# Altium PCB Karta_TETRA.PCBDOC (part 6 of 8)
Units mm, origin at the board's own origin, x right, y up, seen from the top; angles counter-clockwise.
Board outline 70 x 83.2 mm, 6 copper layers (TopLayer, Layer 1, Layer 2, Layer 3, Layer 4, Bottom Layer), stack 0.914 mm thick; 344 components, 222 nets, 1133 pads, 615 vias.
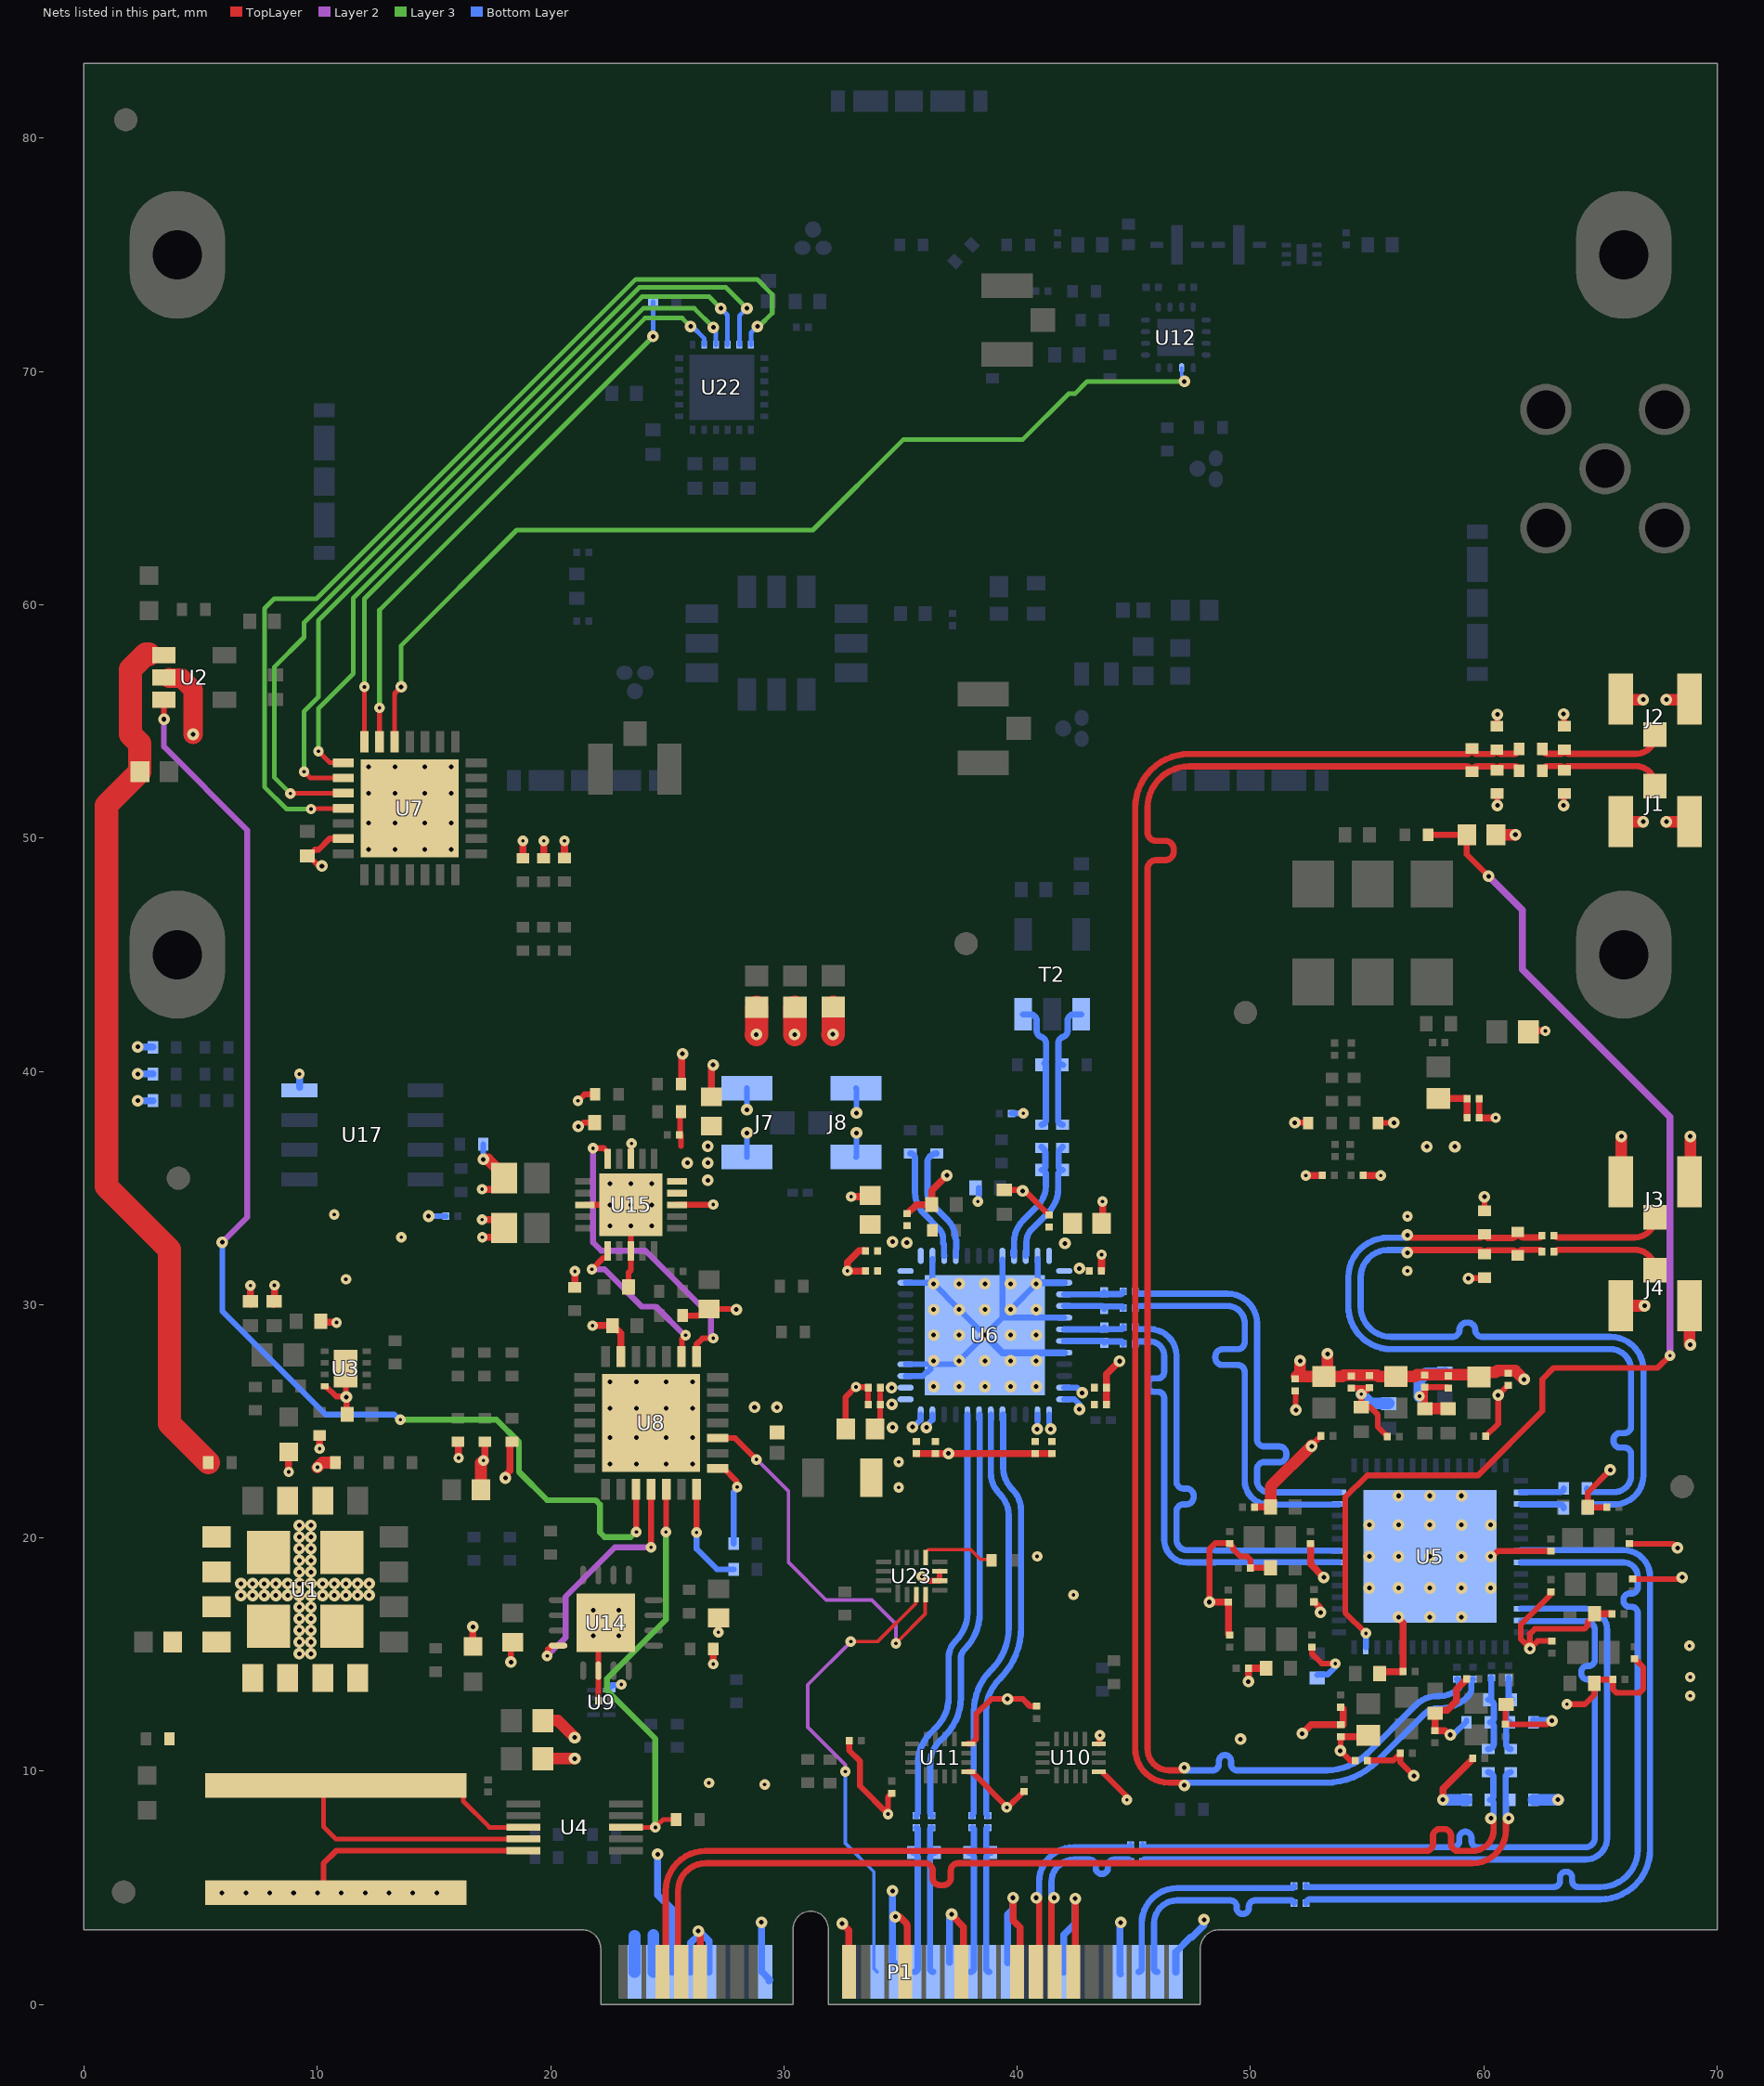
[diagram p7: the nets of this part, all layers, seen from the top]

## Via types
v1: diameter 0.5, hole 0.2, TopLayer to Bottom Layer, tented both sides, 402 vias
v2: diameter 0.45, hole 0.15, TopLayer to Bottom Layer, tented both sides, 189 vias
v3: diameter 0.45, hole 0.15, TopLayer to Bottom Layer, 23 vias
v4: diameter 0.5, hole 0.2, TopLayer to Bottom Layer, 1 vias

## Nets (pads, with @x,y where several pads share a name; then routed paths per layer and width w, separated by ;. In a path a pad name is that pad's centre, name@x,y a point inside that pad or via, vN(x,y) a via of type N, cw(c..) or ccw(c..) an arc to the next point about the centre after c; other vN are vias at no path point) (continued)
12V: C1.2 C3.2 R3.2 R106.2 R121.2 U1.1 U1.2 U1.3 U1.4 U2.1 U4.8 U4.9 | length 57.4
  TopLayer w0.2: U4.9@18.827,7.094 10.793,7.094 10.267,7.62 10.267,8.965 10.692,9.39 R106.2@10.789,9.39 15.837,9.39 16.262,8.965 16.262,8.714 17.382,7.594 U4.8@18.827,7.594
  TopLayer w1: 2.789,57.881 2.65,57.881 1.999,57.23 1.999,54.446 2.389,54.056 2.389,52.832 0.965,51.408 0.965,35.06 3.661,32.364 3.661,24.897 R3.2@5.328,23.229
2122_0VDD: C88.2 C89.2 C90.2 C179.2 FB7.2 U6.25 U6.26 U6.35 U6.36 | length 2.7
  Bottom Layer w0.25: v1(35.509,24.753) 35.553,24.753 35.867,25.067 U6.36@35.867,25.292 ; v1(36.109,24.732) 36.157,24.78 36.157,24.857 36.367,25.067 U6.35@36.367,25.292 ; v1(40.855,24.668) 40.867,24.681 U6.26@40.867,25.292 ; U6.25@41.367,25.292 41.367,24.799 41.431,24.736 v1(41.431,24.668)
  other v3: 34.924,22.166 34.924,23.254
2122_VCC: C76.2 C77.2 C78.2 C79.2 C80.2 C81.2 C82.2 C83.2 C84.2 C85.2 C86.2 C87.2 FB6.2 R96.1 U6.1 U6.12 U6.13 U6.23 U6.24 U6.37 U6.38 U6.48 | length 3.7
  TopLayer w0.25: C86.2@33.899,24.663 34.129,24.894 C81.2@34.129,25.723 C83.2@34.129,26.442
  Bottom Layer w0.25: U6.24@42.017,25.942 42.452,25.942 42.669,25.725 v1(42.669,25.516) ; U6.23@42.017,26.442 42.561,26.442 v1(42.786,26.218)
  other v1: 34.658,24.731 28.744,25.603 29.701,25.602 34.631,25.734 34.615,26.438 42.669,31.552 42.044,32.622 35.27,32.652 34.661,32.692
4610_FINE_3V3: C93.2 C94.2 C97.2 C98.2 C101.2 C102.2 C105.2 C106.2 C109.2 C110.2 C129.2 C130.2 FB8.1 FB9.1 FB10.1 FB11.1 FB12.1 R100.2 R104.2 R105.2 U15.14 U15.15 | length 20.8
  TopLayer w0.25: v2(21.173,38.736) 21.455,39.018 R104.2@21.96,39.018 ; C130.2@25.55,37.314 25.55,38.23 R100.2@25.588,38.268 ; 25.588,36.813 C130.2@25.588,37.279 ; C98.2@53.873,11.481 53.859,11.468 53.859,10.894 v1(53.846,10.881) 54.266,10.461 C97.2@54.495,10.461
  TopLayer w0.3: R105.2@21.034,30.741 21.039,30.747 21.039,31.425 v2(21.045,31.431) ; C105.2@51.923,26.821 53.052,26.821 FB11.1@53.151,26.919 ; C98.2@53.978,11.474 54.979,11.474 FB9.1@55.049,11.544 ; FB12.1@58.054,38.836 C110.2@59.278,38.836 C109.2@59.278,38.01 ; C94.2@58.474,26.949 C94.2@58.484,26.949 ; FB8.1@59.779,26.906 FB8.1@59.788,26.898
  TopLayer w0.5: C105.2@51.969,26.919 FB11.1@53.151,26.919 ; C105.2@51.978,26.923 52.126,27.072 v1(52.126,27.592) ; v1(53.298,27.889) 53.298,27.066 FB11.1@53.151,26.919 ; FB8.1@59.779,26.906 59.678,27.007 57.145,27.007 57.052,26.913 FB10.1@56.234,26.913 56.228,26.919 55.484,26.919 55.417,26.986 53.998,26.986 53.93,26.919 FB11.1@53.151,26.919 ; FB8.1@59.788,26.898 59.988,27.098 60.501,27.098 60.576,27.173 61.349,27.173 v1(61.73,26.792)
  other v1: 26.741,35.328 25.86,36.08 26.741,36.08 26.741,36.788 57.558,36.77 58.758,36.77
04610_Stat0: R9.2 U23.9 | length 3.3
  TopLayer w0.15: U23.9@36.077,19.164 36.077,19.389 36.187,19.5 38.006,19.5 38.429,19.076 38.82,19.076 cw(c38.82,18.962) R9.2@38.901,19.043
04610_Stat0_3V3: U8.24 U23.4 | length 16.2
  TopLayer w0.15: v2(34.799,15.476) 36.06,16.737 36.06,17.548 U23.4@36.077,17.564
  TopLayer w0.25: U8.24@27.16,24.279 27.91,24.279 v2(28.827,23.363)
  Layer 2 w0.15: v2(28.827,23.363) 30.2,21.99 30.2,18.946 31.81,17.336 33.766,17.336 34.799,16.303 v2(34.799,15.476)
+12: P1.2 P1.4 R106.1 U4.10 | length 13.5
  TopLayer w0.25: R106.1@10.789,4.79 10.692,4.79 10.267,5.215 10.267,6.053 10.808,6.594 U4.10@18.827,6.594
  Bottom Layer w0.5: P1.2@23.6,1.4 23.6,2.952 ; P1.4@24.4,1.4 24.4,2.99
  other v1: 5.921,4.776 6.942,4.776 7.964,4.776 8.986,4.776 10.008,4.776 11.029,4.776 12.051,4.776 13.073,4.776 14.095,4.776 15.117,4.776
Ain_2122_A_N: R5.1 U6.4 | length 5
  Bottom Layer w0.268: R5.1@36.547,36.478 ccw(c36.547,36.081) 36.151,36.081 36.151,34.802 ccw(c36.891,34.802) 36.367,34.278 37.034,33.612 cw(c36.278,32.857) 37.347,32.857 37.347,32.854 cw(c37.251,32.758) 37.386,32.758 37.386,32.377 ccw(c37.41,32.353) 37.376,32.353 37.376,32.101 U6.4@37.367,32.092
AIn_2122_A_P: R1.1 U6.3 | length 4.9
  Bottom Layer w0.268: R1.1@35.417,36.478 cw(c35.417,36.272) 35.623,36.272 35.623,34.8 ccw(c36.887,34.8) 35.993,33.906 36.658,33.241 cw(c36.271,32.854) 36.819,32.854 36.819,32.663 ccw(c36.886,32.663) 36.838,32.615 cw(c36.791,32.567) 36.858,32.567 36.858,32.101 U6.3@36.867,32.092
AIn_2122_B_N: R53.1 R56.2 U6.9 | length 5.4
  Bottom Layer w0.268: U6.9@39.867,32.092 39.839,32.12 39.839,32.291 cw(c39.887,32.291) 39.853,32.325 ccw(c39.819,32.359) 39.867,32.359 39.867,32.682 cw(c41.182,32.682) 40.252,33.612 40.875,34.235 ccw(c40.011,35.099) 41.233,35.099 41.233,35.585 ccw(c41.047,35.585) 41.047,35.771 ccw(c41.047,35.937) 41.213,35.937 41.213,36.507 ccw(c40.988,36.507) R56.2@41.147,36.666 ; R56.2@41.047,36.766 R56.2@41.147,36.666
AIn_2122_B_P: R51.2 R53.2 U6.10 | length 5.4
  Bottom Layer w0.268: U6.10@40.367,32.092 40.395,32.12 40.395,32.678 cw(c41.191,32.678) 40.628,33.241 41.326,33.939 ccw(c40.275,34.989) 41.761,34.989 41.761,35.585 cw(c41.947,35.585) 41.947,35.771 cw(c41.947,35.947) 41.771,35.947 41.771,36.403 ccw(c41.747,36.427) 41.781,36.427 41.781,36.507 cw(c42.007,36.507) 41.847,36.666 R51.2@41.947,36.766
AIn_2122B_N: R55.1 R56.1 T2.1 | length 5.6
  Bottom Layer w0.268: T2.1@40.248,42.443 40.566,42.443 cw(c40.566,42.175) 40.834,42.175 40.834,41.743 ccw(c41.118,41.743) 41.041,41.47 cw(c40.966,41.212) 41.234,41.212 41.234,40.504 cw(c41.006,40.504) 41.166,40.341 41.233,40.341 41.233,37.902 cw(c41.047,37.902) R56.1@41.047,37.716
AIn_2122B_P: R51.1 R52.2 T2.3 | length 5.7
  Bottom Layer w0.268: R52.2@41.761,40.341 41.761,37.902 ccw(c41.947,37.902) R51.1@41.947,37.716 ; R52.2@41.98,40.275 cw(c41.98,40.492) 41.762,40.492 41.762,41.212 cw(c42.03,41.212) 41.957,41.47 ccw(c41.878,41.743) 42.162,41.743 42.162,42.175 cw(c42.43,42.175) 42.43,42.443 T2.3@42.748,42.443
Alert_curr_vol_meas: R107.1 U4.3 U8.19 | length 18.7
  TopLayer w0.2: U4.3@23.227,7.594 v2(24.491,7.594) 24.824,7.928 R107.1@25.383,7.928
  TopLayer w0.25: v2(24.945,20.249) 24.953,20.257 24.953,22.072 U8.19@24.96,22.079
  Layer 3 w0.25: v2(24.491,7.594) 24.491,11.392 22.419,13.464 22.419,13.969 24.945,16.495 v2(24.945,20.249)
ATT_TETRA_V1: R83.2 U7.27 | length 23.7
  TopLayer w0.2: U7.27@12.667,54.127 v2(12.667,55.583)
  Layer 3 w0.2: v2(12.667,55.583) 12.667,59.774 v1(24.393,71.5)
  Bottom Layer w0.2: v1(24.393,71.5) R83.2@24.393,72.981
ATT_TETRA_V2: U7.28 U22.20 | length 26.3
  TopLayer w0.2: U7.28@12.017,54.127 v2(12.017,56.48)
  Layer 3 w0.2: v2(12.017,56.48) 12.017,60.258 24.046,72.288 25.645,72.288 v1(26,71.933)
  Bottom Layer w0.2: v1(26,71.933) 26.07,71.933 26.589,71.414 U22.20@26.589,71.149
ATT_TETRA_V3: U7.1 U22.21 | length 30.2
  TopLayer w0.2: v2(10.05,53.722) 10.544,53.227 U7.1@11.117,53.227
  Layer 3 w0.2: v2(10.05,53.722) 10.05,55.55 11.546,57.046 11.546,60.283 23.97,72.707 26.159,72.707 v1(26.979,71.887)
  Bottom Layer w0.2: v1(26.979,71.887) 26.979,71.806 27.089,71.696 U22.21@27.089,71.149
ATT_TETRA_V4: U7.2 U22.22 | length 33.4
  TopLayer w0.2: v2(9.434,52.842) 9.699,52.577 U7.2@11.117,52.577
  Layer 3 w0.2: v2(9.434,52.842) 9.434,55.429 10.05,56.045 10.05,59.329 23.921,73.2 26.801,73.2 v1(27.294,72.707)
  Bottom Layer w0.2: v1(27.294,72.707) 27.589,72.412 U22.22@27.589,71.149
ATT_TETRA_V5: U7.3 U22.23 | length 37.4
  TopLayer w0.2: v2(8.844,51.913) 11.102,51.913 U7.3@11.117,51.927
  Layer 3 w0.2: v2(8.844,51.913) 8.153,52.604 8.153,57.321 9.434,58.603 9.434,59.235 23.799,73.6 27.522,73.6 v1(28.415,72.707)
  Bottom Layer w0.2: U22.23@28.089,71.149 28.089,72.381 v1(28.415,72.707)
ATT_TETRA_V6: U7.4 U22.24 | length 41.9
  TopLayer w0.2: v2(9.735,51.242) 9.753,51.26 11.099,51.26 U7.4@11.117,51.277
  Layer 3 w0.2: v2(9.735,51.242) 8.687,51.242 7.739,52.19 7.739,59.839 8.153,60.253 9.957,60.253 23.654,73.95 28.85,73.95 29.5,73.3 29.5,72.5 28.933,71.933 v1(28.864,71.933)
  Bottom Layer w0.2: U22.24@28.589,71.149 28.589,71.657 v1(28.864,71.933) v1(28.864,71.933)
CLK_SYNC: P1.20 U23.3 | length 20
  TopLayer w0.15: v2(32.868,15.554) 34.012,15.554 35.652,17.193 35.652,17.539 U23.3@35.677,17.564
  Layer 2 w0.15: v2(32.632,9.984) 32.632,10.276 31.025,11.883 31.025,13.711 v2(32.868,15.554)
  Bottom Layer w0.15: v2(32.632,9.984) 32.632,6.914 33.854,5.691 33.854,1.546 P1.20@34,1.4
CLKin0_N: J1.2 R24.1 R25.2 | length 5.6
  TopLayer w0.268: R24.1@62.519,52.882 cw(c62.721,52.882) 62.721,53.084 63.283,53.084 cw(c63.283,52.905) 63.462,52.905 cw(c63.64,52.905) 63.64,53.084 66.5,53.084 cw(c66.5,52.233) J1.2@67.35,52.233
CLKin0_P: J2.2 R28.1 R30.1 | length 5.6
  TopLayer w0.268: R30.1@62.519,53.819 ccw(c62.726,53.819) 62.726,53.612 63.285,53.612 ccw(c63.285,53.79) 63.464,53.79 ccw(c63.642,53.79) 63.642,53.612 66.527,53.612 ccw(c66.527,54.435) J2.2@67.35,54.435
CLKin0P_N: C46.2 R24.2 R26.2 R27.2 | length 76.1
  TopLayer w0.268: v1(47.167,10.153) cw(c47.051,10.153) 47.051,10.037 46.512,10.037 cw(c46.512,10.965) 45.584,10.965 45.584,47.72 45.584,48.681 cw(c45.956,48.681) 45.956,49.053 46.342,49.053 ccw(c46.342,49.425) 46.714,49.425 46.714,49.508 ccw(c46.342,49.508) 46.342,49.88 45.956,49.88 cw(c45.956,50.252) 45.584,50.252 45.584,51.018 45.584,51.281 cw(c47.378,51.281) 47.378,53.075 59.254,53.075 cw(c59.254,52.839) R27.2@59.49,52.839 cw(c59.726,52.839) 59.726,53.075 60.399,53.075 cw(c60.399,52.905) R26.2@60.569,52.905 cw(c60.747,52.905) 60.747,53.084 61.308,53.084 cw(c61.308,52.882) R24.2@61.509,52.882
  Bottom Layer w0.268: v1(47.167,10.153) ccw(c47.283,10.153) 47.283,10.037 48.242,10.037 48.376,10.037 ccw(c48.376,10.305) 48.644,10.305 48.644,10.435 cw(c48.905,10.435) 49.166,10.435 49.166,10.305 ccw(c49.434,10.305) 49.434,10.037 49.907,10.037 53.235,10.037 ; 53.298,10.037 53.235,10.037 ; C46.2@58.857,13.945 58.867,13.945 cw(c58.696,13.773) 58.938,13.773 58.938,13.568 cw(c58.092,14.415) 58.092,13.218 57.998,13.218 ccw(c57.998,11.936) 57.091,12.842 57.071,12.822 55.031,10.781 cw(c53.235,12.577) 53.235,10.037
CLKin0P_P: C47.2 R27.1 R29.1 R30.2 | length 76.1
  TopLayer w0.268: v1(47.167,9.393) ccw(c47.051,9.393) 47.051,9.509 46.512,9.509 cw(c46.512,10.965) 45.056,10.965 45.056,51.281 cw(c47.378,51.281) 47.378,53.603 59.254,53.603 ccw(c59.254,53.839) R27.1@59.49,53.839 ccw(c59.726,53.839) 59.726,53.603 60.369,53.603 ccw(c60.369,53.79) R29.1@60.556,53.79 ccw(c60.735,53.79) 60.735,53.612 61.302,53.612 ccw(c61.302,53.819) R30.2@61.509,53.819
  Bottom Layer w0.268: v1(47.167,9.393) cw(c47.283,9.393) 47.283,9.509 53.237,9.509 ; 53.298,9.509 53.237,9.509 ; C47.2@59.538,13.945 ccw(c59.709,13.773) 59.466,13.773 59.466,13.567 cw(c58.94,13.567) 59.312,13.195 59.311,13.194 cw(c58.093,14.412) 58.093,12.69 58.001,12.69 ccw(c58.001,11.929) 57.463,12.467 57.445,12.449 55.402,10.406 cw(c53.237,12.57) 53.237,9.509
CLKin1_N: P1.5 R37.1 R39.1 | length 44.8
  TopLayer w0.268: P1.5@24.8,1.4 ccw(c24.8,1.536) 24.936,1.536 24.936,4.871 cw(c26.646,4.871) 26.646,6.581 57.378,6.581 57.512,6.581 ccw(c57.512,6.891) 57.822,6.891 57.822,7.213 cw(c58.133,7.213) 58.133,7.524 58.288,7.524 cw(c58.288,7.213) 58.598,7.213 58.598,6.891 ccw(c58.909,6.891) 58.909,6.581 59.507,6.581 ccw(c59.507,7.494) 60.421,7.494 60.421,7.869 ccw(c60.305,7.869) v1(60.305,7.985)
  Bottom Layer w0.268: R39.1@60.193,9.954 cw(c60.193,9.735) 60.412,9.735 60.412,8.928 cw(c60.26,8.928) R37.1@60.26,8.776 cw(c60.26,8.615) 60.421,8.615 60.421,8.101 cw(c60.305,8.101) v1(60.305,7.985)
CLKin1_P: P1.7 R31.1 R32.2 | length 44.6
  TopLayer w0.268: P1.7@25.6,1.4 cw(c25.6,1.536) 25.464,1.536 25.464,4.871 cw(c26.646,4.871) 26.646,6.053 35.157,6.053 36.067,6.053 cw(c36.067,5.743) 36.377,5.743 36.377,5.425 ccw(c36.688,5.425) 36.688,5.115 36.843,5.115 ccw(c36.843,5.425) 37.153,5.425 37.153,5.743 cw(c37.464,5.743) 37.464,6.053 38.1,6.053 59.507,6.053 ccw(c59.507,7.494) 60.949,7.494 60.949,7.869 cw(c61.065,7.869) v1(61.065,7.985)
  Bottom Layer w0.268: v1(61.065,7.985) cw(c61.065,8.101) 60.949,8.101 60.949,8.615 ccw(c60.26,8.615) 60.942,8.707 cw(c61.208,8.744) 60.94,8.744 60.94,8.776 60.94,8.966 60.94,9.735 cw(c61.159,9.735) R31.1@61.159,9.954
CLKin1P_N: C59.2 R34.1 R38.1 R39.2 | length 3.6
  Bottom Layer w0.268: R39.2@60.193,10.954 ccw(c60.193,11.191) 60.429,11.191 60.429,11.923 ccw(c60.258,11.923) R38.1@60.258,12.094 ccw(c60.258,12.264) 60.429,12.264 60.429,12.83 ccw(c60.193,12.83) R34.1@60.193,13.066 ccw(c60.193,13.197) 60.323,13.197 C59.2@60.323,13.999
CLKin1P_P: C54.2 R31.2 R33.2 R34.2 | length 3.6
  Bottom Layer w0.268: C54.2@61.063,13.999 61.063,13.196 ccw(c61.193,13.196) R34.2@61.193,13.066 ccw(c61.193,12.83) 60.957,12.83 60.957,12.267 ccw(c61.129,12.267) R33.2@61.129,12.094 ccw(c61.129,11.923) 60.957,11.923 60.957,11.156 ccw(c61.159,11.156) R31.2@61.159,10.954
CLKout1_C2_N: C58.1 J4.2 | length 4.9
  TopLayer w0.268: C58.1@63.004,32.272 63.004,32.282 63.02,32.298 63.121,32.298 63.177,32.354 66.464,32.354 cw(c66.464,31.478) J4.2@67.34,31.478
CLKout1_C2_P: C57.1 J3.2 | length 4.9
  TopLayer w0.268: C57.1@63.007,32.953 ccw(c63.18,33.127) 63.18,32.882 66.477,32.882 ccw(c66.477,33.745) J3.2@67.34,33.745 ; C57.1@63.007,32.954 C57.1@63.007,32.964
CLKout1_C_N: C58.2 R36.2 R41.2 R42.2 | length 32.5
  TopLayer w0.267: R42.2@60.037,32.112 cw(c60.093,32.112) R42.2@60.093,32.168
  TopLayer w0.268: v1(56.724,32.226) cw(c56.84,32.226) 56.84,32.342 59.873,32.342 59.873,32.326 cw(c59.873,32.162) R42.2@60.037,32.162 cw(c60.201,32.162) 60.201,32.326 61.247,32.326 cw(c61.247,32.118) R41.2@61.455,32.118 cw(c61.691,32.118) 61.691,32.354 62.402,32.354 cw(c62.402,32.272) C58.2@62.484,32.272
  Bottom Layer w0.268: v1(56.724,32.226) ccw(c56.608,32.226) 56.608,32.342 55.894,32.342 ccw(c55.894,31.168) 54.72,31.168 54.72,29.926 ccw(c56.026,29.926) 56.026,28.62 57.244,28.62 58.654,28.62 ccw(c58.654,28.923) 58.958,28.923 cw(c59.261,28.923) 59.261,29.227 59.329,29.227 cw(c59.329,28.923) 59.632,28.923 ccw(c59.936,28.923) 59.936,28.62 60.744,28.62 65.422,28.62 cw(c65.422,27.201) 66.841,27.201 66.841,22.685 cw(c65.59,22.685) 65.59,21.435 64.585,21.435 ccw(c64.585,21.274) R36.2@64.424,21.274
CLKout1_C_P: C57.2 R35.2 R40.2 R41.1 | length 32.5
  TopLayer w0.268: v1(56.724,32.986) ccw(c56.84,32.986) 56.84,32.87 R40.2@59.873,32.87 ; R40.2@60.037,33.018 ccw(c60.201,33.018) 60.201,32.854 61.191,32.854 ccw(c61.191,33.118) R41.1@61.455,33.118 ccw(c61.691,33.118) 61.691,32.882 62.405,32.882 ccw(c62.405,32.964) C57.2@62.487,32.964
  Bottom Layer w0.268: v1(56.724,32.986) cw(c56.608,32.986) 56.608,32.87 55.894,32.87 ccw(c55.894,31.168) 54.192,31.168 54.192,29.926 ccw(c56.026,29.926) 56.026,28.092 65.422,28.092 cw(c65.422,27.201) 66.313,27.201 66.313,27.031 66.313,24.777 cw(c66.032,24.777) 66.032,24.497 65.843,24.497 ccw(c65.843,24.216) 65.562,24.216 65.562,24.154 ccw(c65.843,24.154) 65.843,23.873 66.032,23.873 cw(c66.032,23.592) 66.313,23.592 66.313,23.458 66.313,22.685 cw(c65.59,22.685) 65.59,21.963 64.585,21.963 cw(c64.585,22.124) R35.2@64.424,22.124
CLKout1_N: R36.1 U5.17 | length 1.9
  Bottom Layer w0.268: U5.17@61.593,21.435 63.263,21.435 cw(c63.263,21.274) R36.1@63.424,21.274
CLKout1_P: R35.1 U5.16 | length 1.9
  Bottom Layer w0.268: U5.16@61.593,21.963 63.263,21.963 ccw(c63.263,22.124) R35.1@63.424,22.124
CLKout3_C_N: C51.1 P1.48 | length 9.6
  Bottom Layer w0.268: P1.48@45.2,1.4 ccw(c45.2,1.536) 45.336,1.536 45.336,3.472 cw(c46.854,3.472) 46.854,4.99 51.774,4.99 ccw(c51.774,5.078) C51.1@51.862,5.078
CLKout3_C_P: C50.1 P1.50 | length 9.5
  Bottom Layer w0.268: P1.50@46,1.4 cw(c46,1.536) 45.864,1.536 45.864,3.472 cw(c46.854,3.472) 46.854,4.462 48.482,4.462 49.138,4.462 cw(c49.138,4.194) 49.406,4.194 49.406,4.139 ccw(c49.667,4.139) 49.928,4.139 49.928,4.194 cw(c50.196,4.194) 50.196,4.462 51.234,4.462 51.74,4.462 cw(c51.74,4.339) C50.1@51.862,4.339
CLKout3_N: C51.2 U5.22 | length 33.8
  Bottom Layer w0.268: C51.2@52.382,5.078 ccw(c52.425,5.078) 52.425,5.035 62.862,5.035 62.996,5.035 ccw(c62.996,5.303) 63.264,5.303 63.264,5.434 cw(c63.525,5.434) 63.786,5.434 63.786,5.303 ccw(c64.054,5.303) 64.054,5.035 64.993,5.035 ccw(c64.993,6.642) 66.6,6.642 66.6,16.643 66.6,16.777 ccw(c66.332,16.777) 66.332,17.045 66.25,17.045 cw(c66.25,17.303) 65.992,17.303 65.992,17.36 cw(c66.25,17.36) 66.25,17.618 66.332,17.618 ccw(c66.332,17.886) 66.6,17.886 66.6,18.336 ccw(c65.99,18.336) 65.99,18.947 U5.22@61.593,18.947
CLKout3_P: C50.2 U5.21 | length 33.9
  Bottom Layer w0.268: C50.2@52.382,4.339 cw(c52.55,4.339) 52.55,4.507 64.993,4.507 ccw(c64.993,6.642) 67.128,6.642 67.128,18.336 ccw(c65.99,18.336) 65.99,19.475 U5.21@61.593,19.475
CLKout5_C_N: C192.1 P1.39 | length 8.8
  TopLayer w0.268: v1(41.58,4.575) ccw(c41.58,4.459) 41.464,4.459 41.464,1.728 ccw(c41.928,1.728) P1.39@41.6,1.4
  Bottom Layer w0.268: v1(41.58,4.575) cw(c41.58,4.691) 41.464,4.691 41.464,5.238 cw(c42.44,5.238) 42.44,6.214 43.096,6.214 cw(c43.096,5.946) 43.364,5.946 43.364,5.857 ccw(c43.625,5.857) 43.886,5.857 43.886,5.946 cw(c44.154,5.946) 44.154,6.214 44.594,6.214 44.757,6.214 cw(c44.757,6.116) C192.1@44.855,6.116
CLKout5_C_P: C193.1 P1.37 | length 8.8
  TopLayer w0.268: P1.37@40.8,1.4 ccw(c40.472,1.728) 40.936,1.728 40.936,4.459 ccw(c40.82,4.459) v1(40.82,4.575)
  Bottom Layer w0.268: v1(40.82,4.575) ccw(c40.82,4.691) 40.936,4.691 40.936,5.238 cw(c42.44,5.238) 42.44,6.742 44.757,6.742 ccw(c44.757,6.84) C193.1@44.855,6.84
CLKout5_N: C193.2 U5.27 | length 33.6
  Bottom Layer w0.268: C193.2@45.375,6.84 ccw(c45.473,6.84) 45.473,6.742 58.546,6.742 58.68,6.742 ccw(c58.68,7.01) 58.948,7.01 58.948,7.146 cw(c59.209,7.146) 59.47,7.146 59.47,7.01 ccw(c59.738,7.01) 59.738,6.742 60.412,6.742 64.356,6.742 ccw(c64.356,7.146) 64.76,7.146 64.76,8.776 64.76,13.536 64.76,13.671 ccw(c64.492,13.671) 64.492,13.939 64.435,13.939 cw(c64.435,14.196) 64.178,14.196 64.178,14.254 cw(c64.435,14.254) 64.435,14.511 64.492,14.511 ccw(c64.492,14.779) 64.76,14.779 64.76,15.521 64.76,16.051 ccw(c64.373,16.051) 64.373,16.439 U5.27@61.593,16.439
CLKout5_P: C192.2 U5.26 | length 33.6
  Bottom Layer w0.268: C192.2@45.375,6.116 cw(c45.473,6.116) 45.473,6.214 64.356,6.214 ccw(c64.356,7.146) 65.288,7.146 65.288,15.521 65.288,16.051 ccw(c64.373,16.051) 64.373,16.967 U5.26@61.593,16.967
CLKout8_C_N: C53.1 R43.2 U6.18 | length 2.7
  Bottom Layer w0.268: U6.18@42.017,28.942 43.658,28.942 ccw(c43.658,29.017) R43.2@43.733,29.017 ccw(c43.8,29.017) 43.8,28.95 44.45,28.95 ccw(c44.45,29.046) C53.1@44.546,29.046 cw(c44.518,29.046) C53.1@44.518,29.017
CLKout8_C_P: C52.1 R43.1 U6.19 | length 2.7
  Bottom Layer w0.268: U6.19@42.017,28.442 43.658,28.442 cw(c43.658,28.367) R43.1@43.733,28.367 cw(c43.787,28.367) 43.787,28.422 44.45,28.422 cw(c44.45,28.326) C52.1@44.546,28.326 ccw(c44.504,28.326) C52.1@44.504,28.367
CLKout8_N: C53.2 U5.50 | length 18.5
  Bottom Layer w0.268: C53.2@45.066,29.046 ccw(c45.162,29.046) 45.162,28.95 45.694,28.95 cw(c45.694,27.815) 46.828,27.815 46.828,22.554 46.828,22.42 ccw(c47.131,22.42) 47.131,22.116 47.258,22.116 cw(c47.258,21.813) 47.562,21.813 47.562,21.745 cw(c47.258,21.745) 47.258,21.442 47.131,21.442 ccw(c47.131,21.138) 46.828,21.138 46.828,20.66 46.828,19.932 ccw(c47.286,19.932) 47.286,19.474 48.482,19.474 ccw(c48.5,19.474) 48.5,19.456 49.001,19.456 51.948,19.456 U5.50@53.793,19.456
CLKout8_P: C52.2 U5.49 | length 18.5
  Bottom Layer w0.268: C52.2@45.066,28.326 cw(c45.162,28.326) 45.162,28.422 45.694,28.422 cw(c45.694,27.815) 46.3,27.815 46.3,27.108 cw(c46.032,27.108) 46.032,26.84 45.827,26.84 ccw(c45.827,26.64) 45.627,26.64 45.627,26.468 ccw(c45.827,26.468) 45.827,26.268 46.032,26.268 cw(c46.032,26) 46.3,26 46.3,25.365 46.3,19.932 ccw(c47.286,19.932) 47.286,18.946 48.482,18.946 48.482,18.956 U5.49@53.793,18.956
CLKout10_C_N: C56.1 R44.2 U6.16 | length 2.7
  Bottom Layer w0.268: U6.16@42.017,29.942 43.604,29.942 cw(c43.604,29.817) R44.2@43.729,29.817 cw(c43.837,29.817) 43.837,29.926 44.467,29.926 cw(c44.467,29.847) C56.1@44.546,29.847
CLKout10_C_P: C55.1 R44.1 U6.15 | length 2.7
  Bottom Layer w0.268: U6.15@42.017,30.442 43.634,30.442 ccw(c43.634,30.537) R44.1@43.729,30.537 ccw(c43.812,30.537) 43.812,30.454 44.433,30.454 ccw(c44.433,30.567) C55.1@44.546,30.567
CLKout10_N: C56.2 U5.54 | length 18.5
  Bottom Layer w0.268: C56.2@45.066,29.847 cw(c45.162,29.847) 45.162,29.943 49.01,29.943 cw(c49.01,29.2) 49.752,29.2 49.752,28.392 cw(c49.449,28.392) 49.449,28.088 48.799,28.088 ccw(c48.799,27.785) 48.496,27.785 48.496,27.717 ccw(c48.799,27.717) 48.799,27.414 49.449,27.414 cw(c49.449,27.111) 49.752,27.111 49.752,26.442 49.752,22.46 ccw(c50.781,22.46) 50.781,21.431 U5.54@53.793,21.431
CLKout10_P: C55.2 U5.55 | length 18.5
  Bottom Layer w0.268: C55.2@45.066,30.567 ccw(c45.162,30.567) 45.162,30.471 49.01,30.471 cw(c49.01,29.2) 50.28,29.2 50.28,24.36 50.28,24.226 ccw(c50.584,24.226) 50.584,23.923 51.234,23.923 cw(c51.234,23.619) 51.538,23.619 51.538,23.552 cw(c51.234,23.552) 51.234,23.249 50.584,23.249 ccw(c50.584,22.945) 50.28,22.945 50.28,22.46 ccw(c50.781,22.46) 50.781,21.959 U5.55@53.793,21.959
CMLOUT_A_N: C64.2 P1.26 R82.1 | length 6.6
  Bottom Layer w0.268: C64.2@36.34,7.571 ccw(c36.34,7.499) 36.268,7.499 36.268,6.756 ccw(c36.504,6.756) R82.1@36.504,6.52 ccw(c36.504,6.284) 36.268,6.284 36.268,1.532 ccw(c36.4,1.532) P1.26@36.4,1.4
CMLOUT_A_P: C63.2 P1.24 R82.2 | length 6.6
  Bottom Layer w0.268: P1.24@35.6,1.4 ccw(c35.6,1.54) 35.74,1.54 35.74,6.284 ccw(c35.504,6.284) R82.2@35.504,6.52 ccw(c35.504,6.756) 35.74,6.756 35.74,7.511 ccw(c35.68,7.511) C63.2@35.68,7.571
CMLOUT_AC_N: C64.1 U6.31 | length 17.8
  Bottom Layer w0.268: C64.1@36.34,8.091 cw(c36.5,8.251) 36.274,8.251 36.274,10.338 cw(c37.585,10.338) 36.658,11.266 36.907,11.515 ccw(c35.27,13.152) 37.585,13.152 37.585,14.842 cw(c38.121,14.842) 37.742,15.221 37.747,15.225 ccw(c36.181,16.791) 38.395,16.791 U6.31@38.395,25.292
CMLOUT_AC_P: C63.1 U6.32 | length 17.8
  Bottom Layer w0.268: C63.1@35.68,8.091 cw(c35.781,8.091) 35.71,8.163 ccw(c35.622,8.251) 35.746,8.251 35.746,10.338 cw(c37.585,10.338) 36.285,11.639 36.533,11.887 ccw(c35.267,13.153) 37.057,13.153 37.057,14.846 cw(c38.113,14.846) 37.366,15.592 37.369,15.594 ccw(c36.166,16.797) 37.867,16.797 U6.32@37.867,25.292
CMLOUT_B_N: C61.2 P1.32 R81.1 | length 6.5
  Bottom Layer w0.268: C61.2@38.734,7.571 ccw(c38.734,7.512) 38.675,7.512 38.675,6.756 ccw(c38.911,6.756) R81.1@38.911,6.52 ccw(c38.911,6.284) 38.675,6.284 38.675,1.525 ccw(c38.8,1.525) P1.32@38.8,1.4
CMLOUT_B_P: C60.2 P1.30 R81.2 | length 6.6
  Bottom Layer w0.268: P1.30@38,1.4 ccw(c38,1.547) 38.147,1.547 38.147,6.284 ccw(c37.911,6.284) R81.2@37.911,6.52 ccw(c37.911,6.756) 38.147,6.756 38.147,7.498 ccw(c38.073,7.498) C60.2@38.073,7.571
CMLOUT_BC_N: C61.1 U6.29 | length 17.9
  Bottom Layer w0.268: C61.1@38.734,8.091 cw(c38.894,8.251) 38.668,8.251 38.668,12.571 cw(c40.61,12.571) 39.237,13.945 39.271,13.979 ccw(c37.103,16.147) 40.169,16.147 40.169,21.16 ccw(c38.848,21.16) 39.782,22.095 cw(c40.716,23.029) 39.395,23.029 39.395,25.292 U6.29@39.367,25.292
CMLOUT_BC_P: C60.1 U6.30 | length 17.8
  Bottom Layer w0.268: C60.1@38.073,8.091 cw(c38.175,8.091) 38.103,8.163 ccw(c38.015,8.251) 38.14,8.251 38.14,12.571 cw(c40.61,12.571) 38.863,14.318 38.897,14.352 ccw(c37.101,16.148) 39.641,16.148 39.641,20.942 ccw(c38.32,20.942) 39.254,21.876 cw(c40.188,22.81) 38.867,22.81 U6.30@38.867,25.292
CTRL_VCXO: C38.1 R20.1 U5.41 | length 51.7
  TopLayer w0.25: v2(54.947,15.911) 54.06,16.799 54.06,21.746 54.999,22.685 59.752,22.685 62.509,25.443 62.509,26.803 62.996,27.29 67.454,27.29 v2(67.979,27.815) ; R20.1@57.569,50.14 C38.1@59.269,50.14 59.269,49.298 v1(60.202,48.364)
  Layer 2 w0.3: v1(60.202,48.364) 61.646,46.921 61.646,44.374 67.979,38.041 v2(67.979,27.815)
  Bottom Layer w0.25: U5.41@54.943,15.306 54.945,15.309 54.945,15.909 v2(54.947,15.911)
EN_5V: U2.3 U8.17 | length 53.3
  TopLayer w0.25: U2.3@3.419,55.931 3.427,55.923 v1(3.427,55.093) ; v1@5.908,32.653 v1(5.928,32.673) ; U8.17@23.66,22.079 23.668,22.072 23.668,20.257 v2(23.675,20.249)
  Layer 2 w0.25: v1(3.427,55.093) 3.427,53.914 7.002,50.34 7.002,33.747 v1(5.928,32.673)
  Layer 3 w0.25: v2(13.564,25.067) 17.681,25.067 18.645,24.104 18.645,22.829 19.854,21.62 21.93,21.62 22.116,21.434 22.116,20.233 22.31,20.039 23.429,20.039 23.64,20.249 v2(23.675,20.249)
  Bottom Layer w0.25: v1(5.928,32.673) 5.928,29.723 10.359,25.292 13.298,25.292 13.523,25.067 v2(13.564,25.067)
EN_LMK_1V8: U8.2 U15.6 | length 7.3
  TopLayer w0.25: v2(21.766,31.517) 21.773,31.517 22.26,32.004 22.43,32.004 22.445,32.019 U15.6@22.445,32.304 ; U8.2@25.61,27.779 25.629,27.798 25.629,28.534 v2(25.787,28.692)
  Layer 2 w0.25: v2(21.766,31.517) 22.313,31.517 23.914,29.915 24.515,29.915 25.738,28.692 v2(25.787,28.692)
EN_LMK_3V3: U8.1 U15.20 | length 13.7
  TopLayer w0.25: v2(21.823,36.703) 22.284,36.703 22.43,36.557 22.43,36.269 U15.20@22.445,36.254 ; U8.1@26.26,27.779 26.26,28.303 26.516,28.559 v2(26.969,28.559)
  Layer 2 w0.25: v2(21.823,36.703) 21.823,32.662 22.17,32.315 24.069,32.315 26.875,29.509 26.875,28.653 v2(26.969,28.559)
EN_LMK_SPI: R87.2 U8.22 | length 3.5
  TopLayer w0.25: U8.22@27.16,22.979 27.425,22.979 27.971,22.433
  Bottom Layer w0.25: R87.2@27.846,19.755 27.846,21.975 28,22.129 v2(28,22.183)
EN_LTC_SPI: R13.2 U8.21 | length 4.5
  TopLayer w0.25: v2(26.26,20.233) U8.21@26.26,22.079
  Bottom Layer w0.25: v2(26.26,20.233) 26.26,19.531 27.136,18.655 R13.2@27.846,18.655
EN_POWER_LTC2122: U8.18 U14.4 | length 10.7
  TopLayer w0.25: v2(19.855,14.942) 19.883,14.97 19.883,15.219 20.048,15.384 U14.4@20.323,15.384 ; v2(24.31,19.594) U8.18@24.31,22.079
  Layer 2 w0.25: v2(19.855,14.942) 20.641,15.728 20.641,17.48 22.754,19.594 v2(24.31,19.594)
EN_RF_P_1: U7.26 U12.14 | length 43.1
  TopLayer w0.2: U7.26@13.317,54.127 13.317,56.197 v1(13.6,56.48)
  Layer 3 w0.2: v1(13.6,56.48) 13.6,58.254 18.546,63.2 31.24,63.2 35.112,67.072 40.228,67.072 42.2,69.044 42.473,69.044 43.003,69.574 v1(47.162,69.574)
  Bottom Layer w0.15: U12.14@47.047,70.157 47.047,69.784 47.162,69.669 v1(47.162,69.574)
GND: C2.1 C6.1 C7.1 C8.1 C9.1 C14.2 C15.2 C35.1 C36.1 C37.1 C38.2 C39.2 C45.1 C65.1 C66.1 C67.1 C68.1 C70.2 C71.2 C73.1 C74.1 C75.1 C76.1 C77.1 C78.1 C79.1 C80.1 C81.1 C82.1 C83.1 C84.1 C85.1 C86.1 C87.1 C88.1 C89.1 C90.1 C91.1 C92.2 C93.1 C94.1 C95.1 C96.1 C97.1 C98.1 C99.1 C100.1 C101.1 C102.1 C103.1 C104.1 C105.1 C106.1 C107.1 C108.1 C109.1 C110.1 C113.1 C114.1 C115.1 C116.1 C117.1 C118.1 C119.1 C120.1 C121.1 C122.1 C123.1 C124.1 C125.1 C126.1 C127.1 C128.1 C129.1 C131.1 C132.1 C133.1 C134.1 C135.1 C136.1 C137.1 C138.1 C139.1 C140.1 C141.1 C143.1 C144.1 C145.1 C146.1 C147.1 C148.1 C149.1 C150.1 C151.1 C152.1 C154.1 C179.1 D9.2 D12.2 FB15.2 FB30.2 FB31.2 FB32.1 FB33.1 FB34.1 J1.1 J1.3 J2.1 J2.3 J3.1 J3.3 J4.1 J4.3 J7.1 J7.3 J8.1 J8.3 P1.6 P1.8 P1.9 P1.10 P1.16 P1.17 P1.22 P1.23 P1.28 P1.29 P1.34 P1.35 P1.40 P1.41 P1.46 P1.52 R4.1 R7.1 R19.2 R23.1 R25.1 R26.1 R28.2 R29.2 R32.1 R33.1 R37.2 R38.2 R40.1 R42.1 R60.1 R61.1 R62.1 R72.1 R73.1 R74.1 R77.2 R79.1 R99.1 R101.1 R103.2 R114.1 R115.1 U1.5 U1.6 U1.7 U1.8 U1.14 U1.15 U1.EP U2.2 U3.4 U3.9 U5.57 U6.2 U6.8 U6.11 U6.14 U6.17 U6.20 U6.39 U6.40 U6.47 U6.49 U7.6 U7.29 U8.6 U8.29 U9.1 U10.5 U10.8 U11.5 U11.8 U14.6 U14.17 U15.3 U15.8 U15.13 U15.18 U15.21 U17.4 U23.6 U23.7 | length 264
  TopLayer w0.25: C68.1@9.576,49.239 C68.1@9.626,49.239 ; v1(10.2,48.8) 10.152,48.848 10.018,48.848 C68.1@9.626,49.239 ; U3.4@10.316,26.507 10.366,26.507 10.814,26.059 v1@11.229,26.059 ; U7.6@11.117,49.977 10.529,49.977 10.059,49.507 9.894,49.507 C68.1@9.626,49.239 ; U3.9@11.229,26.963 v1@11.229,26.059 ; C6.1@11.29,25.299 11.26,25.33 11.26,26.028 v1(11.244,26.043) v1@11.229,26.059 ; v1(18.3,14.678) 18.3,15.449 C91.1@18.385,15.534 ; v1(21.189,37.636) 21.257,37.636 21.421,37.8 C152.1@21.885,37.8 ; U15.3@21.47,34.279 v1(22.545,34.279) v1(23.445,34.279) v1(23.445,33.379) U15.8@23.445,32.304 23.445,31.482 23.341,31.377 C151.1@23.341,30.764 ; C92.2@22.063,13.023 22.048,13.038 U14.6@22.048,14.309 22.048,16.034 U14.17@22.373,16.359 ; U15.18@23.445,36.254 23.445,36.882 v2(23.47,36.906) ; U15.13@25.42,34.279 25.425,34.284 26.965,34.284 v2(26.969,34.288) ; R103.2@25.654,29.531 26.316,29.531 26.326,29.54 26.513,29.54 C141.1@26.788,29.815 27.943,29.815 v1(27.966,29.792) ; C86.1@32.649,24.663 32.649,26.035 v2(33.088,26.474) 33.103,26.458 33.594,26.458 C83.1@33.609,26.442 C81.1@33.609,25.723 ; C15.2@32.807,11.319 32.807,10.889 33.259,10.436 33.259,9.365 v2(34.463,8.161) 34.463,8.897 34.59,9.024 34.59,9.034 34.615,9.059 C14.2@34.625,9.059 ; v2(35.913,18.348) 35.967,18.348 36.15,18.164 U23.6@36.677,18.164 U23.7@36.677,18.564 ; U11.5@37.9,9.979 38.05,9.979 39.552,8.477 v2(39.552,8.45) 39.597,8.45 40.277,9.13 C70.2@40.287,9.13 ; U11.8@37.9,11.179 38.05,11.179 38.242,11.371 38.242,12.45 38.889,13.097 v1(39.583,13.097) 40.24,13.097 40.553,12.784 C71.2@40.84,12.784 ; C74.1@39.449,34.92 40.186,34.92 v1(40.235,34.871) 40.334,34.871 41.357,33.848 C77.1@41.367,33.848 ; U10.8@43.497,11.179 43.522,11.204 43.522,11.513 v2(43.548,11.539) ; U10.5@43.67,9.954 44.664,8.96 44.664,8.814 v2(44.702,8.776) ; v1(48.242,17.249) 48.242,19.526 48.49,19.774 49.097,19.774 C135.1@49.122,19.749 ; C135.1@49.112,19.749 C135.1@49.122,19.749 ; C128.1@50.858,18.718 C126.1@49.999,18.718 49.999,19.056 49.849,19.206 49.568,19.206 49.259,19.515 49.259,19.602 49.147,19.714 49.147,19.724 C135.1@49.122,19.749 ; v1(51.9,37.8) 51.907,37.807 52.494,37.807 R19.2@52.502,37.815 ; C105.1@51.904,26.292 C105.1@51.913,26.301 51.931,26.283 51.931,25.499 v1(51.948,25.482) ; v1@52.626,23.973 53.016,24.362 C107.1@53.016,24.372 ; C119.1@52.634,15.316 52.634,15.032 53.05,14.616 v2(53.632,14.616) ; C106.1@54.314,26.428 54.319,26.432 C102.1@55.077,26.432 ; C97.1@55.015,10.461 56.126,10.461 C148.1@56.424,10.759 ; C102.1@55.091,26.436 55.081,26.436 C102.1@55.077,26.432 ; R23.1@55.542,37.785 55.549,37.793 56.136,37.793 v1(56.144,37.8) ; C103.1@55.864,24.342 55.864,24.352 55.459,24.757 55.459,25.277 55.132,25.603 C108.1@54.754,25.603 54.754,26.109 C102.1@55.077,26.432 ; C148.1@56.424,10.769 C148.1@56.424,10.759 ; v1(57.002,9.806) 56.424,10.383 C148.1@56.424,10.759 ; C104.1@57.471,25.54 C101.1@57.471,26.457 58.447,26.457 58.474,26.429 C94.1@58.484,26.429 ; v1(59.344,31.123) 59.364,31.142 60.018,31.142 R42.1@60.037,31.162 ; C109.1@59.798,38.01 C110.1@59.798,38.836 ; v1(60.022,34.62) 60.03,34.612 60.03,34.026 R40.1@60.037,34.018 ; C95.1@60.086,24.355 60.086,24.365 60.615,24.894 v1(60.615,26.122) 61.029,26.536 C93.1@61.039,26.536 ; v1(60.293,19.206) 60.36,19.206 60.594,19.44 C123.1@62.884,19.44 ; R29.2@60.556,54.79 60.57,54.804 60.57,55.283 v1(60.583,55.296) ; R26.1@60.576,51.898 60.576,51.407 v1(60.583,51.4) ; C116.1@60.962,12.865 60.93,12.834 C113.1@60.93,12.008 62.703,12.008 62.853,12.158 v1(62.921,12.158) ; C133.1@62.884,17.694 62.874,17.694 62.849,17.669 62.849,17.55 61.581,16.282 61.581,15.674 v1@61.976,15.279 ; C145.1@62.911,15.584 62.307,15.584 v1(61.976,15.254) v1@61.976,15.279 ; v1(63.423,51.4) 63.437,51.414 R25.1@63.437,51.891 ; v1(63.423,55.315) 63.438,55.3 63.438,54.806 R28.2@63.454,54.79 ; v2(63.567,12.872) 64.333,12.872 64.737,13.277 C146.1@64.737,13.763 64.737,13.782 64.887,13.932 C144.1@65.528,13.932 65.528,13.516 65.685,13.36 66.669,13.36 66.84,13.531 66.84,14.451 66.499,14.793 66.499,14.803 66.474,14.828 C143.1@66.464,14.828 ; C134.1@64.744,16.751 64.744,16.701 64.456,16.413 64.456,16.249 64.31,16.102 62.192,16.102 61.976,15.887 v1@61.976,15.279 ; C121.1@65.278,21.31 65.275,21.313 64.46,21.313 C124.1@64.456,21.317 64.456,21.948 v1(65.422,22.913) ; C122.1@66.24,19.749 68.127,19.749 v1(68.3,19.576) ; C132.1@66.373,18.237 66.379,18.231 68.418,18.231 v1(68.5,18.312)
  TopLayer w0.3: C9.1@7.134,30.01 7.14,30.015 v2(7.14,30.816) ; C8.1@8.151,30.01 8.165,30.023 v2(8.165,30.831) ; v2(8.776,22.829) D12.2@8.776,23.689 ; C7.1@10.016,29.282 10.045,29.252 10.809,29.252 v2(10.828,29.233) ; v2(10.102,23.827) R7.1@10.102,24.389 R7.1@10.102,24.439 ; v2(16.062,23.428) 16.047,23.444 16.047,24.102 R74.1@16.063,24.118 ; D9.2@16.674,15.344 v1(16.674,16.194) ; v2(17.061,33.648) C139.1@17.625,33.647 ; v2@17.061,34.946 C140.1@17.625,34.946 ; v2(17.074,32.886) C139.1@17.638,32.885 ; v2@17.184,23.344 R73.1@17.184,24.108 ; v1(18.064,22.572) 18.103,22.61 18.103,22.716 18.267,22.881 R72.1@18.267,24.099 ; R60.1@18.818,49.082 R60.1@18.818,49.132 v2(18.818,49.879) ; R61.1@19.707,49.082 R61.1@19.707,49.132 v2(19.707,49.879) ; R62.1@20.596,49.082 R62.1@20.596,49.139 v2(20.596,49.879) ; v2(21.8,29.1) C67.1@22.655,29.1 22.671,29.1 23.01,28.761 U8.6@23.01,27.779 ; R101.1@25.588,39.456 25.621,39.489 25.621,40.72 v1(25.653,40.753) ; v1(26.332,3.15) 26.423,3.059 26.423,1.423 P1.9@26.4,1.4 ; C129.1@26.892,38.9 26.892,40.143 26.969,40.22 v1(26.969,40.275) ; v2(26.969,14.592) R99.1@26.969,15.353 ; v2(27.194,15.957) C75.1@27.194,16.644 ; v1(32.502,3.472) 32.786,3.187 P1.17@32.786,1.4 ; v2(32.885,34.629) C87.1@33.571,34.629 ; C84.1@33.407,31.442 v2(32.721,31.442) 32.721,31.807 33.218,32.303 C79.1@33.499,32.303 ; v1(34.774,3.76) 34.971,3.76 35.253,3.478 cw(c34.981,3.353) 35.281,3.353 P1.23@35.281,1.407 ; C82.1@35.284,33.902 35.294,33.902 35.681,34.288 C73.1@36.338,34.288 36.338,34.891 v1(36.982,35.536) ; C90.1@35.677,23.617 C179.1@36.492,23.617 v1(37.057,23.617) C89.1@40.779,23.617 C88.1@41.492,23.617 ; v1(37.191,3.869) 37.191,3.832 37.693,3.33 P1.29@37.693,1.408 ; v1(39.826,4.575) 39.826,3.592 40.12,3.298 P1.35@40.12,1.415 ; P1.41@42.488,1.422 v1(42.488,4.54) ; C78.1@43.616,31.444 v2(43.616,32.139) ; C76.1@43.658,33.532 v2(43.658,34.419) ; C80.1@43.832,25.723 C85.1@43.832,26.442 43.832,27.023 v1(44.384,27.576) ; v1(48.242,17.249) C125.1@49.053,17.25 49.053,15.882 49.089,15.846 49.089,15.836 C118.1@49.099,15.836 ; v1(49.907,13.846) C117.1@49.907,14.414 C120.1@50.669,14.414 ; C136.1@50.174,21.323 C138.1@50.863,21.323 ; v1(52.216,11.615) 52.602,12.001 C98.1@53.873,12.001 ; v2(52.375,35.536) C39.2@53.073,35.536 ; C137.1@52.576,19.749 52.576,18.88 v1(53.143,18.312) ; C127.1@52.719,17.259 52.729,17.259 52.967,17.021 52.967,16.843 v1(53.005,16.805) ; C98.1@53.978,11.994 C99.1@53.978,12.674 ; C45.1@54.833,35.536 v2(55.584,35.536) ; C100.1@55.64,14.29 55.64,14.288 55.665,14.263 56.534,14.263 C149.1@56.534,14.273 56.534,16.361 56.343,16.552 v1(56.343,16.606) ; v1(58.243,8.776) 58.243,9.257 59.517,10.532 C114.1@59.517,10.557 ; v1(58.568,11.558) 58.514,11.558 58.327,11.745 C147.1@57.909,11.745 C150.1@57.909,12.481 58.034,12.606 58.42,12.606 58.833,13.019 58.833,13.516 59.257,13.94 C115.1@59.257,13.95 ; C109.1@59.821,38.01 v2(60.507,38.01) ; FB15.2@61.95,41.735 v2(62.636,41.735) ; C134.1@64.744,16.751 C131.1@65.489,16.751
  TopLayer w0.5: v2(10.008,23.026) 10.211,23.229 R4.1@10.778,23.229 ; C2.1@17.014,22.072 17.014,23.211 v2(17.12,23.317) ; v1(17.12,36.223) 17.315,36.223 18.011,35.527 C140.1@18.011,35.427 ; FB30.2@19.675,10.536 v1(21.034,10.536) ; FB31.2@19.675,12.167 20.312,12.167 v1(21.034,11.446) ; C138.1@50.863,21.323 50.863,22.21 v1@52.626,23.973 ; C104.1@57.471,25.54 C96.1@58.473,25.54 ; C38.2@60.519,50.14 v1(61.354,50.14) ; J4.3@65.865,29.953 v1(66.89,29.953) ; J3.1@65.898,35.407 v1(65.899,37.209) ; J1.3@65.94,50.698 v1(66.827,50.698) ; J2.1@65.94,55.931 v1(66.827,55.931) ; v1(67.827,50.699) J1.1@68.715,50.699 ; v1(67.827,55.931) J2.3@68.715,55.931 ; J4.1@68.815,29.953 68.815,28.316 ccw(c68.848,28.316) v1(68.848,28.283) ; J3.3@68.847,35.407 v1@68.847,37.208
  TopLayer w0.85: U2.2@3.649,56.858 3.651,56.856 4.181,56.856 4.679,56.358 v1(4.679,54.446)
  TopLayer w1: v1(28.821,41.577) 28.836,41.591 FB34.1@28.836,42.745 ; v1(30.462,41.577) 30.476,41.591 FB33.1@30.476,42.745 ; v1(32.099,41.584) 32.114,41.598 FB32.1@32.114,42.752
  Bottom Layer w0.25: v1(14.774,33.794) C154.1@15.517,33.794 ; R115.1@17.111,36.872 17.115,36.868 17.115,36.227 v1(17.12,36.223) ; U9.1@22.514,13.57 22.629,13.685 22.997,13.685 v2(23.029,13.716) ; J7.3@28.415,36.325 v1(28.415,37.357) ; v1(28.415,38.356) J7.1@28.415,39.275 ; J8.1@33.088,36.325 33.111,36.349 v1(33.111,37.357) ; J8.3@33.088,39.275 33.111,39.251 v1(33.111,38.214) ; U6.39@35.217,26.942 35.942,26.942 36.117,27.117 36.167,27.117 36.292,27.242 36.292,27.442 U6.40@35.217,27.442 ; U6.47@35.217,30.942 U6.49@36.367,30.942 ; U6.2@36.367,31.967 U6.49@36.367,30.942 ; U6.49@36.417,27.442 37.367,27.442 v1(37.517,27.592) v1(38.617,28.692) ; v2(38.318,34.419) ccw(c38.318,34.454) 38.353,34.454 C65.1@38.353,35.004 ; U6.8@39.367,31.93 U6.49@39.367,29.442 ; C66.1@39.757,38.196 39.759,38.198 40.263,38.198 v2(40.265,38.2) ; U6.11@40.88,31.96 40.88,30.955 v1(39.717,29.792) U6.49@39.367,29.442 ; U6.17@42.017,29.442 U6.49@39.367,29.442 ; C35.1@52.861,14.129 52.876,14.144 53.305,14.144 53.632,14.471 v2(53.632,14.616) ; v1(58.568,11.558) 58.68,11.558 59.26,12.139 R38.2@59.26,12.189 ; U6.49@36.367,30.942 v1(36.417,30.892) v1(37.517,29.792) v1(38.617,28.692) ; v1(38.617,28.692) U6.49@39.367,29.442
  Bottom Layer w0.3: v1(2.303,38.743) R77.2@2.954,38.743 ; v1(2.303,39.886) R79.1@2.954,39.886 ; v1(2.303,41.055) R114.1@2.954,41.055 ; U17.4@9.237,39.322 v2(9.237,39.886) ; v1(24.59,6.444) 24.59,4.7 25.2,4.09 P1.6@25.2,1.4 ; P1.8@26,1.4 26,2.638 26.332,2.97 v1(26.332,3.15) 26.379,3.15 26.8,2.728 P1.10@26.8,1.4 ; v1(29.04,3.523) 29.04,1.421 29.4,1.062 P1.16@29.357,1.019 ; v1(34.658,4.871) 34.658,1.863 P1.22@34.724,1.796 ; P1.28@37.107,1.803 37.107,3.785 v1(37.191,3.869) ; v1(38.617,28.692) 39.367,27.942 U6.20@42.017,27.942 ; P1.34@39.583,1.796 39.583,3.854 39.826,4.097 v1(39.826,4.575) ; U6.49@40.892,30.942 U6.14@42.017,30.942 ; P1.40@42,1.4 42,2.991 42.488,3.479 v1(42.488,4.54) ; P1.46@44.427,1.32 44.403,1.344 44.403,3.476 v1(44.439,3.512) ; P1.52@46.8,1.4 46.8,2.25 47.433,2.883 47.481,2.883 48.006,3.408 v1(48.006,3.632) ; R33.1@62.13,12.189 62.146,12.174 62.905,12.174 v1(62.921,12.158)
  Bottom Layer w0.5: v2(54.746,26.167) 55.156,25.757 C37.1@55.918,25.757 ; v2(57.244,26.071) 57.244,26.768 57.524,27.048 58.349,27.048 C36.1@58.326,27.072 ; v1(58.243,8.776) R37.2@59.26,8.776 ; R32.1@62.13,8.776 v1(63.182,8.776)
  other v1: 49.57,11.379 9.228,15.038 9.728,15.038 9.228,15.538 9.728,15.538 21.823,15.809 22.923,15.809 9.228,16.038 9.728,16.038 9.228,16.538 9.728,16.538 57.693,16.606 59.043,16.606 21.823,16.909 22.923,16.909 9.229,17.039 9.729,17.039 6.729,17.538 7.229,17.538 7.729,17.538 8.229,17.538 8.729,17.539 9.229,17.539 9.729,17.539 10.229,17.539 10.729,17.539 11.229,17.539 11.728,17.539 12.228,17.54 55.093,17.856 56.343,17.856 57.693,17.856 59.043,17.856 60.293,17.856 6.729,18.038 7.229,18.038 7.729,18.038 8.229,18.038 8.729,18.039 9.229,18.039 9.729,18.039 10.229,18.039 10.729,18.039 11.229,18.039 11.728,18.039 12.228,18.04 9.229,18.539 9.729,18.539 9.228,19.039 9.728,19.039 55.093,19.206 56.343,19.206 57.693,19.206 59.043,19.206 9.228,19.539 9.728,19.539 9.228,20.039 9.728,20.039 9.228,20.539 9.728,20.539 55.093,20.556 56.343,20.556 57.693,20.556 59.043,20.556 60.293,20.556 56.343,21.806 57.693,21.806 59.043,21.806 22.54,23.159 23.675,23.159 24.945,23.159 26.08,23.159 52.626,23.928 22.54,24.294 23.675,24.294 24.945,24.294 26.08,24.294 22.54,25.564 23.675,25.564 24.945,25.564 26.08,25.564 36.417,26.492 37.517,26.492 38.617,26.492 39.717,26.492 40.817,26.492 22.54,26.699 23.675,26.699 24.945,26.699 26.08,26.699 36.417,27.592 38.617,27.592 39.717,27.592 40.817,27.592 36.417,28.692 37.517,28.692 39.717,28.692 40.817,28.692 36.417,29.792 38.617,29.792 40.817,29.792 37.517,30.892 38.617,30.892 39.717,30.892 40.817,30.892 22.545,33.379 24.345,33.379 24.345,34.279 22.545,35.179 23.445,35.179 24.345,35.179 68.848,37.208 12.197,49.507 13.332,49.507 14.602,49.507 15.737,49.507 12.197,50.642 13.332,50.642 14.602,50.642 15.737,50.642 12.197,51.912 13.332,51.912 14.602,51.912 15.737,51.912 12.197,53.047 13.332,53.047 14.602,53.047 15.737,53.047
  other v2: 29.177,9.434 26.788,9.5 68.848,13.226 68.848,14.033 68.815,15.373 42.411,17.559 40.855,19.206 11.229,31.089 56.724,31.442 13.6,32.886 56.728,33.784 10.729,33.862 17.061,34.947